# Altium PCB testPCB.PcbDoc
Units mil, origin at the board's own origin, x right, y up, seen from the top; angles counter-clockwise.
Board outline 9990 x 5285 mil, 2 copper layers (Top Layer, Bottom Layer); 128 components, 70 nets, 541 pads, 0 vias.
Unrouted connection lines stored in the file: 277.
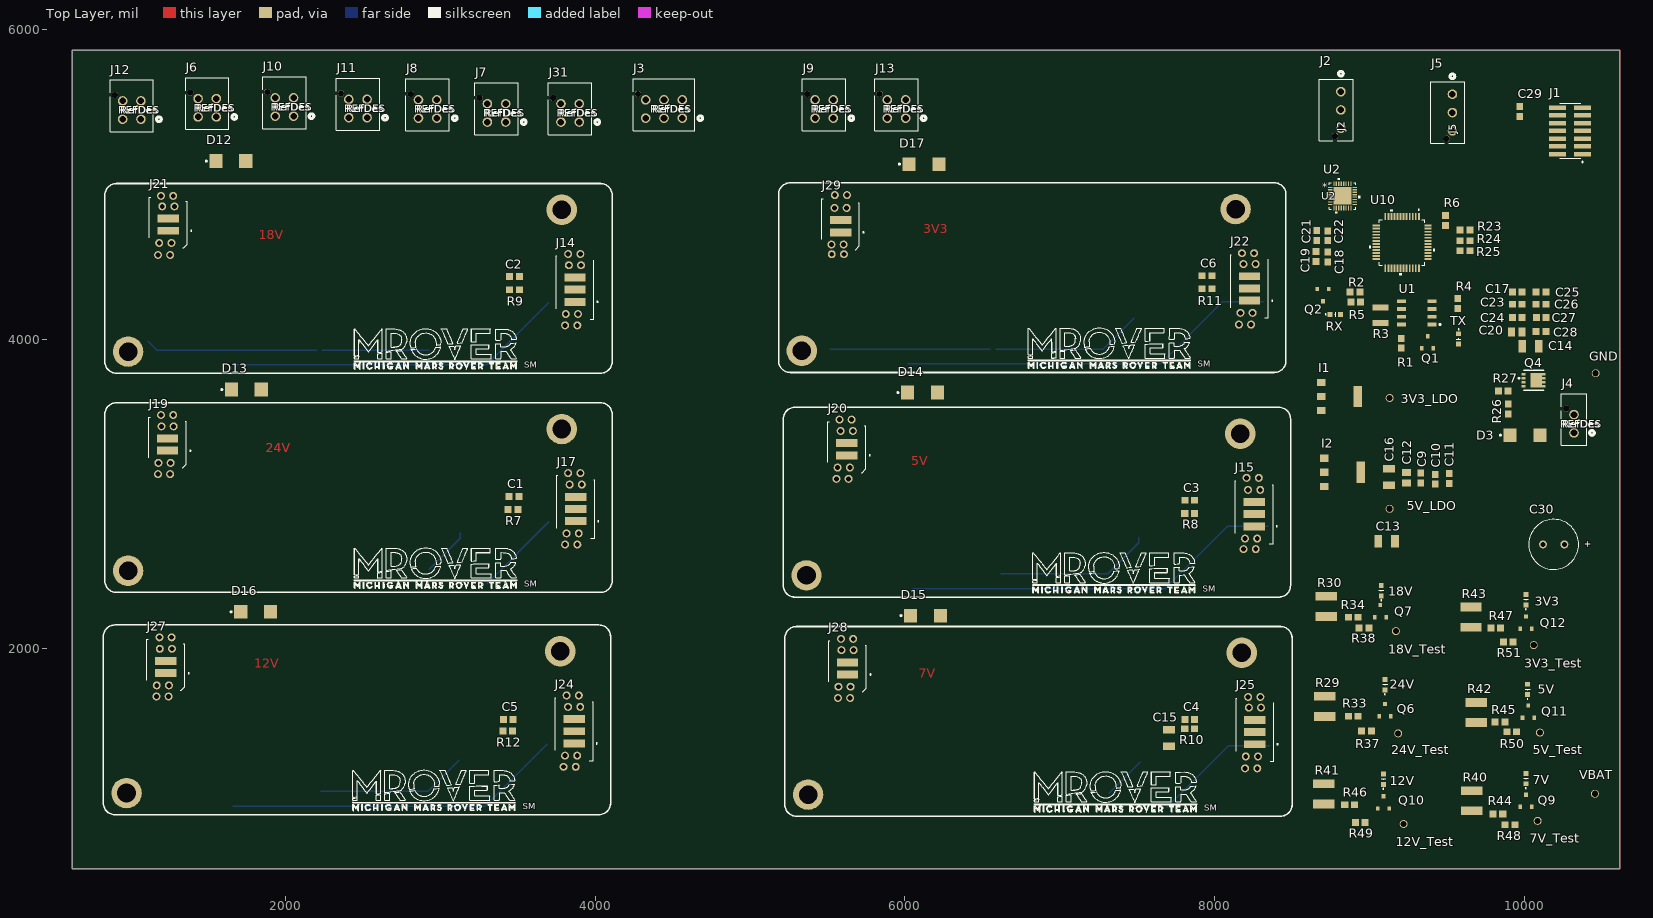
[diagram p0: Top Layer view]
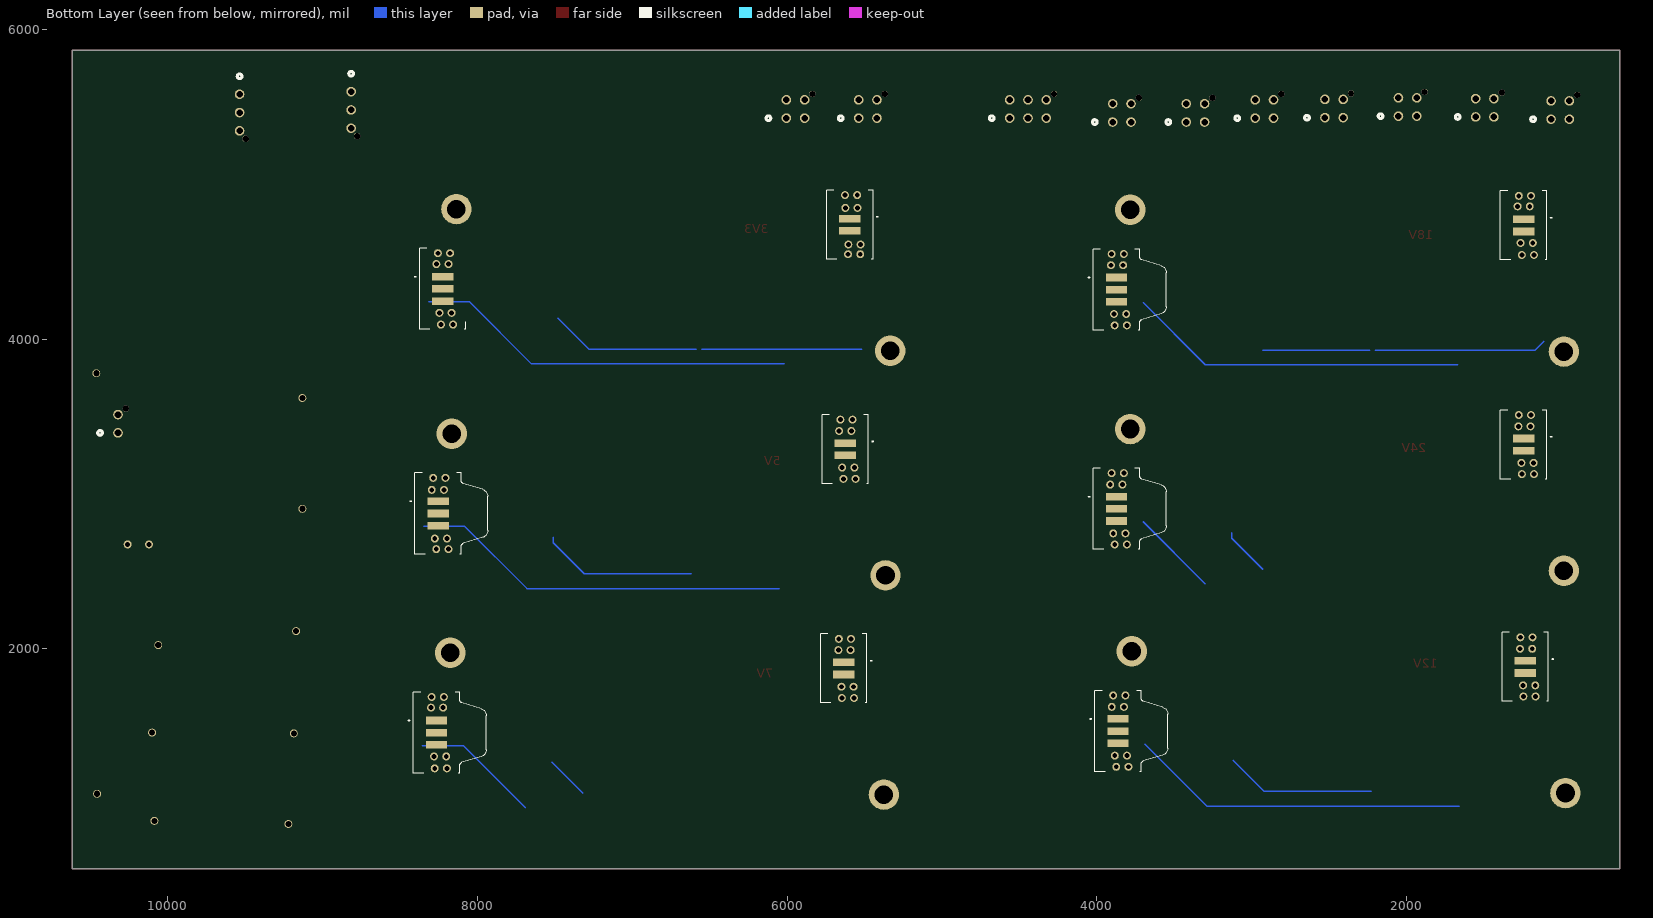
[diagram p1: Bottom Layer view, seen from below]

## Layer stack, top to bottom
Top Solder: solder mask 0.4, Solder Resist, Dk 3.5
Top Layer: signal copper 1.4
Dielectric 1: dielectric 12.6, FR-4, Dk 4.8
Bottom Layer: signal copper 1.4
Bottom Solder: solder mask 0.4, Solder Resist, Dk 3.5

## Board outline
625,580 625,5865 10615,5865 10615,580

## Design rules (kind name [scope] priority, off if disabled: settings)
Clearance [All] p1: gap=10 ignorepadtopadclearanceinfootprint=FALSE
DiffPairsRouting [All] p1: maxlimit=10 minlimit=10 mostfreqgap=10 toplayer_minwidth=15 toplayer_maxwidth=15 toplayer_prefwidth=15 bottomlayer_minwidth=15 bottomlayer_maxwidth=15 bottomlayer_prefwidth=15 maxuncoupledlength=500
PolygonConnect [All] p1: connectstyle=Relief reliefconductorwidth=10 reliefentries=4 polygonreliefangle="90 Angle" airgapwidth=10
RoutingVias [All] p1: holewidth=28 width=50 viastyle="Through Hole" minholewidth=28 minwidth=50 maxholewidth=28 maxwidth=50
SolderMaskExpansion [All] p1: expansion=0 istentingtop=FALSE
SupplyNets "Schematic Supply Nets_10" [InNet('18V_IN')] p1: voltage=0.000
SupplyNets "Schematic Supply Nets_9" [InNet('VBAT_MCU')] p2: voltage=0.000
SupplyNets "Schematic Supply Nets_8" [InNet('AGND')] p3: voltage=0.000
SupplyNets "Schematic Supply Nets_7" [InNet('12V_BUCK_C')] p4: voltage=0.000
SupplyNets "Schematic Supply Nets_6" [InNet('7V_IN')] p5: voltage=0.000
SupplyNets "Schematic Supply Nets_5" [InNet('5V_LDO')] p6: voltage=0.000
SupplyNets "Schematic Supply Nets_4" [InNet('24V_IN')] p7: voltage=0.000
SupplyNets "Schematic Supply Nets_3" [InNet('12V_IN')] p8: voltage=0.000
SupplyNets "Schematic Supply Nets_2" [InNet('VBAT')] p9: voltage=0.000
SupplyNets "Schematic Supply Nets_1" [InNet('5V_IN')] p10: voltage=0.000
SupplyNets "Schematic Supply Nets" [InNet('3V3_IN')] p11: voltage=0.000
Width [All] p1: maxlimit=10 minlimit=10 preferedwidth=10
29 further rules are at their usual default settings.

## Classes and differential pairs
component class PGOODs: 3V3 3V3_Test 5V 5V_Test 7V 7V_Test 12V 12V_Test 18V 18V_Test 24V 24V_Test Q6 Q7 Q9 Q10 Q11 Q12 R29 R30 R33 R34 R37 R38 R40 R41 R42 R43 R44 R45 R46 R47 R48 R49 R50 R51
component class Other_Connectors: C30 D3 D12 D13 D14 D15 D16 D17 GND J2 J3 J4 J5 J6 J7 J8 J9 J10 J11 J12 J13 J31 Q4 R26 R27 VBAT
component class MCU: C21 C22 C23 C24 C25 C26 C27 C28 C29 J1 R6 R23 R24 R25 U2 U10
component class LDOs: 3V3_LDO 5V_LDO C9 C10 C11 C12 C13 C14 C15 C16 C17 C18 C19 C20 I1 I2
component class Daughter_Card_Connectors: C1 C2 C3 C4 C5 C6 J14 J15 J17 J19 J20 J21 J22 J24 J25 J27 J28 J29 R7 R8 R9 R10 R11 R12
component class CAN_Transciever: Q1 Q2 R1 R2 R3 R4 R5 RX TX U1
differential pair CAN: +CAN_P -CAN_N

## Components (designator, comment, footprint, x,y, rotation, side; value= is the part's Value field where it differs from the comment)
3V3 "BL-HKC36G-AV-TRB" LED-0603 10039.58,2261.8 r90 top
3V3_LDO "5003" TEST-POINT-0001 9130,3620 r90 top
3V3_Test "5003" TEST-POINT-0001 10060,2025 r0 top
5V "BL-HKC36G-AV-TRB" LED-0603 10049.58,1681.81 r90 top
5V_LDO "5003" TEST-POINT-0001 9130,2905 r90 top
5V_Test "5003" TEST-POINT-0001 10100,1460 r0 top
7V "BL-HKC36G-AV-TRB" LED-0603 10039.58,1106.81 r90 top
7V_Test "5003" TEST-POINT-0001 10085,890 r0 top
12V "BL-HKC36G-AV-TRB" LED-0603 9119.58,1101.81 r90 top
12V_Test "5003" TEST-POINT-0001 9220,870 r0 top
18V "BL-HKC36G-AV-TRB" LED-0603 9105.31,2319.15 r90 top
18V_Test "5003" TEST-POINT-0001 9170,2115 r0 top
24V "BL-HKC36G-AV-TRB" LED-0603 9129.58,1711.81 r90 top
24V_Test "5003" TEST-POINT-0001 9185,1455 r0 top
C1 "GRM1885C1H302JA01D" CAP-0603 3476.5,2985 r180 top
C2 "GRM1885C1H302JA01D" CAP-0603 3480,4405 r180 top
C3 "GRM1885C1H302JA01D" CAP-0603 7840,2960 r180 top
C4 "GRM1885C1H302JA01D" CAP-0603 7840,1545 r180 top
C5 "GRM1885C1H302JA01D" CAP-0603 3440,1545 r180 top
C6 "GRM1885C1H302JA01D" CAP-0603 7950,4410 r180 top
C9 "CC0603KRX5R6BB106" CAP-0603 9330,3103.5 r270 top
C10 "CC0402KRX7R7BB104" CAP-0603 9425,3095 r270 top
C11 "CC0402KRX7R7BB104" CAP-0603 9515,3100 r270 top
C12 "CC0805JRNPO9BN471" CAP-0805 9240,3105.35 r270 top
C13 "293D106X9016A2TE3" CAP-1206 9110,2695 r0 top
C14 "293D106X9016A2TE3" CAP-1206 10039.13,3955 r180 top
C15 "293D106X9016A2TE3" CAP-1206 7705,1425 r270 top
C16 "293D106X9016A2TE3" CAP-1206 9125,3110 r270 top
C17 "CC0603KRX5R6BB106" CAP-0603 9953.5,4305 r180 top
C18 "CC0402KRX7R7BB104" CAP-0603 8730,4530 r90 top
C19 "CC0402KRX7R7BB104" CAP-0603 8655,4533.5 r90 top
C20 "CC0805JRNPO9BN471" CAP-0805 9950.35,4045 r180 top
C21 "CC0603KRX7R7BB104" CAP-0603 8660,4670 r270 top
C22 "CC0603KRX7R7BB104" CAP-0603 8730,4668.5 r270 top
C23 "CC0603KRX7R7BB104" CAP-0603 9953.5,4225 r180 top
C24 "CC0603KRX5R8BB475" CAP-0603 9953.5,4140 r180 top
C25 "CC0603KPX7R9BB103" CAP-0603 10106.5,4305 r180 top
C26 "CC0603KRX7R7BB105" CAP-0603 10106.5,4225 r180 top
C27 "CC0603KPX7R9BB103" CAP-0603 10108.5,4140 r180 top
C28 "CC0603KRX7R7BB105" CAP-0603 10106.5,4050 r180 top
C29 "CC0603KRX7R0BB104" CAP-0603 9970,5470 r270 top
C30 "860040674004" WCAP-ATUL_8X11.5(DXL) 10188.9,2675 r0 top
D3 "SMBJ40CA" "DO-214AA (SMBJ)" 10005,3380 r180 top
D12 "SMBJ18" "DO-214AA (SMBJ)" 1650,5150 r180 top
D13 "SMBJ5.0" "DO-214AA (SMBJ)" 1750,3675 r180 top
D14 "SMBJ5.0" "DO-214AA (SMBJ)" 6115,3655 r180 top
D15 "SMBJ12" "DO-214AA (SMBJ)" 6135,2215 r180 top
D16 "SMBJ12" "DO-214AA (SMBJ)" 1810,2240 r180 top
D17 "SMBJ12" "DO-214AA (SMBJ)" 6125,5130 r180 top
GND "5003" TEST-POINT-0001 10460,3780 r0 top
I1 "LM1117IMPX-3.3/NOPB" IC-SOT-223-4 8806.89,3630 r0 top
I2 "LM1117MPX-5.0/NOPB" IC-SOT-223-4 8825,3140 r0 top
J1 "FTSH-107-01-L-DV-K" SAMTEC_FTSH-107-01-L-DV-K 10294.88,5345 r90 top
J2 "2165712003" CONN_2165710003-SD_03_MOL 8815,5598.11 r90 top
J3 "Molex 43045-0612" CONN_2068320000-SD_06_MOL 4563.11,5426.89 r0 top
J4 "2068320201" CONN_2068320000-SD_02_MOL 10320,3395 r0 top
J5 "2165712003" CONN_2165710003-SD_03_MOL 9535,5581.22 r90 top
J6 "2068320401" CONN_2068320000-SD_04_MOL 1555,5435 r0 top
J7 "2068320401" CONN_2068320000-SD_04_MOL 3423.11,5401.89 r0 top
J8 "2068320401" CONN_2068320000-SD_04_MOL 2978.11,5426.89 r0 top
J9 "2068320401" CONN_2068320000-SD_04_MOL 5538.11,5426.89 r0 top
J10 "2068320401" CONN_2068320000-SD_04_MOL 2053.11,5440 r0 top
J11 "2068320401" CONN_2068320000-SD_04_MOL 2528.11,5430 r0 top
J12 "2068320401" CONN_2068320000-SD_04_MOL 1068.11,5420 r0 top
J13 "2068320401" CONN_2068320000-SD_04_MOL 6005,5426.89 r0 top
J14 "CONN-3-POS-1" SAMTEC_UMPS-03-03.5-L-V-S-W-TR 3870,4320 r90 top
J15 "CONN-3-POS-1" SAMTEC_UMPS-03-03.5-L-V-S-W-TR 8255,2870 r90 top
J17 "CONN-3-POS-1" SAMTEC_UMPS-03-03.5-L-V-S-W-TR 3875,2903.74 r90 top
J19 "CONN-2-POS-1" SAMTEC_UMPS-02-X-X-V-S-W-X 1240,3319.37 r90 top
J20 "CONN-2-POS-1" SAMTEC_UMPS-02-X-X-V-S-W-X 5625,3289.37 r90 top
J21 "CONN-2-POS-1" SAMTEC_UMPS-02-X-X-V-S-W-X 1245,4739.37 r90 top
J22 "CONN-3-POS-1" SAMTEC_UMPS-03-03.5-L-V-S-W-TR 8225.32,4327.48 r90 top
J24 "CONN-3-POS-1" SAMTEC_UMPS-03-03.5-L-V-S-W-TR 3865,1468.74 r90 top
J25 "CONN-3-POS-1" SAMTEC_UMPS-03-03.5-L-V-S-W-TR 8260,1463.74 r90 top
J27 "CONN-2-POS-1" SAMTEC_UMPS-02-X-X-V-S-W-X 1229.06,1883.11 r90 top
J28 "CONN-2-POS-1" SAMTEC_UMPS-02-X-X-V-S-W-X 5630,1874.37 r90 top
J29 "CONN-2-POS-1" SAMTEC_UMPS-02-X-X-V-S-W-X 5585,4729.37 r90 top
J31 "2068320401" CONN_2068320000-SD_04_MOL 3898.11,5401.89 r0 top
Q1 "T2N7002AK,LM" IC-SOT23-3 9375,3980 r0 top
Q2 "T2N7002AK,LM" IC-SOT23-3 8700,4284.37 r180 top
Q4 "CSD18543Q3AT" IC-8VSONCLIP 9960.16,3807.32 r270 top
Q6 "T2N7002AK,LM" IC-SOT23-3 9100,1605.63 r0 top
Q7 "T2N7002AK,LM" IC-SOT23-3 9070,2245 r0 top
Q9 "T2N7002AK,LM" IC-SOT23-3 10010,1020 r0 top
Q10 "T2N7002AK,LM" IC-SOT23-3 9090,1010 r0 top
Q11 "T2N7002AK,LM" IC-SOT23-3 10025,1595 r0 top
Q12 "T2N7002AK,LM" IC-SOT23-3 10010,2170 r0 top
R1 "RC0402FR-07470RL" RES-0603 9205,3973.5 r90 top
R2 "RC0402FR-07470RL" RES-0603 8906.5,4305 r0 top
R3 "RC1210FR-07120RL" RES-1210 9070,4154.8 r270 top
R4 "RC0603FR-07100RL" RES-0603 9570,4230 r90 top
R5 "RC0603FR-07100RL" RES-0603 8911.5,4240 r0 top
R6 "CRF2010-J/-000ELF" RES-0603 9490,4766.5 r270 top
R7 "CRF2010-J/-000ELF" RES-0603 3470,2900 r0 top
R8 "CRF2010-J/-000ELF" RES-0603 7838.5,2875 r0 top
R9 "CRF2010-J/-000ELF" RES-0603 3480,4320 r0 top
R10 "CRF2010-J/-000ELF" RES-0603 7838.5,1485 r0 top
R11 "CRF2010-J/-000ELF" RES-0603 7950,4325 r0 top
R12 "CRF2010-J/-000ELF" RES-0603 3436.5,1470 r0 top
R23 "RC0603JR-0710KL" RES-0603 9616.5,4705 r0 top
R24 "RC0603JR-0710KL" RES-0603 9616.5,4635 r0 top
R25 "RC0603JR-0710KL" RES-0603 9616.5,4570 r0 top
R26 "RC0603FR-07200KL" RES-0603 9895,3550 r90 top
R27 "RC0603FR-07100KL" RES-0603 9863.5,3665 r180 top
R29 "SR2512JK-7W100RL" RES-2512 8710,1629.96 r90 top
R30 "SR2512JK-7W100RL" RES-2512 8720,2275 r90 top
R33 "*RC0402JR-07150KL" RES-0603 8895,1565 r180 top
R34 "*RC0402JR-07150KL" RES-0603 8895,2205 r180 top
R37 "RC0603FR-0722KL" RES-0603 8980,1470 r180 top
R38 "RC0603FR-0722KL" RES-0603 8965,2135 r180 top
R40 "SR2512JK-7W100RL" RES-2512 9660,1020.04 r90 top
R41 "SR2512JK-7W100RL" RES-2512 8705,1064.96 r90 top
R42 "SR2512JK-7W100RL" RES-2512 9690,1589.96 r90 top
R43 "SR2512JK-7W100RL" RES-2512 9655,2204.96 r90 top
R44 "*RC0402JR-07150KL" RES-0603 9828.5,935 r180 top
R45 "*RC0402JR-07150KL" RES-0603 9842.02,1528.31 r180 top
R46 "*RC0402JR-07150KL" RES-0603 8871.5,995 r180 top
R47 "*RC0402JR-07150KL" RES-0603 9815,2135 r180 top
R48 "RC0402FR-0710KL" RES-0603 9906.5,865 r180 top
R49 "RC0402FR-07100KL" RES-0603 8940,880 r180 top
R50 "RC0402FR-0710KL" RES-0603 9918.5,1465 r180 top
R51 "RC0402FR-0710KL" RES-0603 9895,2045 r180 top
RX "BL-HKC36G-AV-TRB" LED-0603 8721.81,4130.43 r0 top
TX "BL-HKC36G-AV-TRB" LED-0603 9545.42,4058.2 r270 top
U1 "TCAN1044VDRQ1" IC-8SOIC 9305,4170 r90 top
U2 "ADS131M06IRSNR" QFN_M06IRSNR_TEX 8825,4925 r0 top
U10 "STM32G431CBT6" IC-LQFP48 9210,4625 r270 top
VBAT "5003" TEST-POINT-0001 10455,1065 r90 top

## Footprints (in the part's own frame and the unit in brackets; to place one, negate y for a bottom-side part, rotate by r counter-clockwise, add the part's x,y. Pads: shape width x height; smd on the part's side, far side on the other; paste and mask are expansions set on the pad)
CAP-0603 [mm]
  rect 1.15x1.1 smd: 1(-0.8,0) 2(0.8,0)
  body extent -0.8,-0.45 0.8,0.45, height 0.8
CAP-0805 [mm]
  rect 1.16x1.47 smd: 1(-0.88,0) 2(0.88,0)
  body extent -1,-0.63 1,0.63, height 0.94
CAP-1206 [mm]
  rect 1.25x2 smd: 1(-1.375,0) 2(1.375,0)
  body extent -1.6,-0.8 1.6,0.8, height 1.5
CONN_2068320000-SD_02_MOL [mil]
  round 62 / inner round 60 / far side round 62 hole 42 paste-99999 mask+0: 1(0,0) 2(0,118.11)
  round 40 / inner round 60 / far side round 40 hole 40 unplated paste-99999 mask+0: 3(-50.39,156.69)
  silkscreen extent -81,-81 131,254
CONN_2068320000-SD_04_MOL [mil]
  round 62 / inner round 60 / far side round 62 hole 42 paste-99999 mask+0: 1(0,0) 2(-118.11,0) 3(0,118.11) 4(-118.11,118.11)
  round 40 / inner round 60 / far side round 40 hole 40 unplated paste-99999 mask+0: 5(-168.5,156.69)
  silkscreen extent -199,-81 131,254
CONN_2068320000-SD_06_MOL [mil]
  round 62 / inner round 60 / far side round 62 hole 42 paste-99999 mask+0: 1(0,0) 2(-118.11,0) 3(-236.22,0) 4(0,118.11) 5(-118.11,118.11) 6(-236.22,118.11)
  round 40 / inner round 60 / far side round 40 hole 40 unplated paste-99999 mask+0: 7(-286.61,156.69)
  silkscreen extent -317,-81 131,254
CONN_2165710003-SD_03_MOL [mil]
  round 62 hole 42 paste-99999 mask+0: 1(0,0) 2(-118.11,0) 3(-236.22,0)
  round 42 hole 42 unplated paste-99999 mask+0: 4(-286.61,38.58)
  silkscreen extent -317,-81 131,139
"DO-214AA (SMBJ)" [mm]
  rect 2.16x2.26 smd: 1(-2.416,0) 2(2.484,0)
  silkscreen extent 3.94,-0.12 4.19,0.12, body extent -2.72,-1.95 2.78,1.95, height 2.45
IC-8SOIC [mm]
  rect 0.6x1.5 smd: 1(-1.905,-2.5) 2(-0.635,-2.5) 3(0.635,-2.5) 4(1.905,-2.5) 5(1.905,2.5) 6(0.635,2.5) 7(-0.635,2.5) 8(-1.905,2.5)
  silkscreen extent -2.03,-3.94 -1.78,-3.69, body extent -2.45,-3 2.45,3, height 1.75
IC-8VSONCLIP [mm]
  rect 0.4x0.7 smd paste-100 mask+0.05: 1(2.812,0.877) 2(0.862,0.877) 2(1.512,0.877) 2(2.162,0.877) 3(0.862,4.077) 3(1.512,4.077) 3(2.162,4.077) 3(2.812,4.077)
  rect 2.45x1.9 smd paste-100 mask+0.05: 3(1.837,2.917)
  silkscreen extent 0.19,0.03 3.49,4.18, body extent 0.18,0.89 3.48,4.19, height 1.1
IC-LQFP48 [mil]
  rect 47x12 smd paste+0 mask+0: 1(-167.32,108.27) 2(-167.32,88.58) 3(-167.32,68.9) 4(-167.32,49.21) 5(-167.32,29.53) 6(-167.32,9.84) 7(-167.32,-9.84) 8(-167.32,-29.53) 9(-167.32,-49.21) 10(-167.32,-68.9) 11(-167.32,-88.58) 12(-167.32,-108.27) 25(167.32,-108.27) 26(167.32,-88.58) 27(167.32,-68.9) 28(167.32,-49.21) 29(167.32,-29.53) 30(167.32,-9.84) 31(167.32,9.84) 32(167.32,29.53) 33(167.32,49.21) 34(167.32,68.9) 35(167.32,88.58) 36(167.32,108.27)
  rect 12x47 smd paste+0 mask+0: 13(-108.27,-167.32) 14(-88.58,-167.32) 15(-68.9,-167.32) 16(-49.21,-167.32) 17(-29.53,-167.32) 18(-9.84,-167.32) 19(9.84,-167.32) 20(29.53,-167.32) 21(49.21,-167.32) 22(68.9,-167.32) 23(88.58,-167.32) 24(108.27,-167.32) 37(108.27,167.32) 38(88.58,167.32) 39(68.9,167.32) 40(49.21,167.32) 41(29.53,167.32) 42(9.84,167.32) 43(-9.84,167.32) 44(-29.53,167.32) 45(-49.21,167.32) 46(-68.9,167.32) 47(-88.58,167.32) 48(-108.27,167.32)
  silkscreen extent -214,-211 211,211, body extent -177,-177 177,177, height 63
IC-SOT23-3 [mm]
  rect 0.6x0.7 smd: 1(-0.95,-1) 2(0.95,-1) 3(0,1)
  body extent -1.46,-1.18 1.46,1.19, height 1.12
IC-SOT-223-4 [mm]
  rect 1.4x1.2 smd mask+0.07: 1(-3,2.3) 3(-3,-2.3) 4(-3,0)
  rect 1.4x3.5 smd: 2(3,0)
  body extent -3.5,-3.25 3.5,3.25, height 1.68
LED-0603 [mm]
  rect 0.8x0.8 smd: 1(2.291,0.751) 2(0.589,0.751)
  silkscreen extent -0.2,0.34 1.52,1.13, body extent 0.65,0.36 2.25,1.16, height 0.39
QFN_M06IRSNR_TEX [mil]
  rect 30x8 smd paste+0 mask+0: 1(-78.5,55.12) 2(-78.5,39.38) 3(-78.5,23.62) 4(-78.5,7.88) 5(-78.5,-7.88) 6(-78.5,-23.62) 7(-78.5,-39.38) 8(-78.5,-55.12) 17(78.5,-55.12) 18(78.5,-39.38) 19(78.5,-23.62) 20(78.5,-7.88) 21(78.5,7.88) 22(78.5,23.62) 23(78.5,39.38) 24(78.5,55.12)
  rect 8x30 smd paste+0 mask+0: 9(-55.12,-78.5) 10(-39.38,-78.5) 11(-23.62,-78.5) 12(-7.88,-78.5) 13(7.88,-78.5) 14(23.62,-78.5) 15(39.38,-78.5) 16(55.12,-78.5) 25(55.12,78.5) 26(39.38,78.5) 27(23.62,78.5) 28(7.88,78.5) 29(-7.88,78.5) 30(-23.62,78.5) 31(-39.38,78.5) 32(-55.12,78.5)
  rect 114x114 smd paste-57 mask+0: 33(0,0)
  silkscreen extent -86,-114 114,114, body extent -81,-81 81,81, height 32
RES-0603 [mm]
  rect 1.15x1.1 smd: 1(-0.8,0) 2(0.8,0)
  body extent -0.8,-0.4 0.8,0.4, height 0.43
RES-1210 [mm] "Chip Resistor, 2-Leads, Body 3.10x2.60mm, IPC High Density"
  rect 0.95x2.6 smd: 1(-1.275,0) 2(1.275,0)
  body extent -1.6,-1.35 1.6,1.35, height 0.6
RES-2512 [mm]
  rect 1.45x3.5 smd: 1(-1.65,0) 2(1.65,0)
SAMTEC_FTSH-107-01-L-DV-K [mm]
  rect 0.74x2.79 smd: 01(-3.81,-2.035) 02(-3.81,2.035) 03(-2.54,-2.035) 04(-2.54,2.035) 05(-1.27,-2.035) 06(-1.27,2.035) 07(0,-2.035) 08(0,2.035) 09(1.27,-2.035) 10(1.27,2.035) 11(2.54,-2.035) 12(2.54,2.035) 13(3.81,-2.035) 14(3.81,2.035)
  silkscreen extent -5.19,-2.13 4.53,1.72, body extent -4.44,-2.82 4.44,3.02, height 5.96
SAMTEC_UMPS-02-X-X-V-S-W-X [mm]
  rect 1.3x3.5 smd: 01(-1,0) 02(1,0)
  round 1.308 hole 0.8: SH1(-3,1.5) SH2(3,1) SH3(-3,-0.5) SH4(3,-1)
  silkscreen extent -3.83,-3.85 4.52,3.1
SAMTEC_UMPS-03-03.5-L-V-S-W-TR [mm]
  rect 1.3x3.5 smd: 01(-2,0) 02(0,0) 03(2,0)
  round 1.308 hole 0.8: S1(-4,1.5) S2(4,1) S3(-4,-0.5) S4(4,-1)
  silkscreen extent -4.82,-3.8 5.53,3.1
TEST-POINT-0001 [mm] "2024 miniature test point"
  round 1.3 hole 1: 1(0,0)
  body extent -1.27,-1.27 1.27,1.27, height 4.57
WCAP-ATUL_8X11.5(DXL) [mm]
  round 1.308 hole 0.8: 1(1.75,0) 2(-1.75,0)
  silkscreen extent -4.1,-4.1 4.1,4.1

## Part data
3V3 5V 7V 12V 18V 24V RX TX: library part LED-0001, "LED YELLOW CLEAR 0603 SMD", Forward Current=30mA, Forward Voltage=2V, ComponentLink1Description=Datasheet, ComponentLink1URL=https://www.americanbrightled.com/pdffiles/led-components/smt/BL-HKC36G-AV-TRB.pdf
3V3_LDO 3V3_Test 5V_LDO 5V_Test 7V_Test 12V_Test 18V_Test 24V_Test GND VBAT: library part TEST-POINT-0001, "Oranange PC Test Point, Miniature Phoisphor Bronze Silver Plating Through Hole Mounting Type"
C1 C2 C3 C4 C5 C6: library part CAP-3N-0001, "3000 pF ±5% 50V Ceramic Capacitor C0G, NP0 0603 (1608 Metric)", Capacitance="47 nF", Voltage=50V, ComponentLink1Description=Datasheet, ComponentLink1URL=https://mm.digikey.com/Volume0/opasdata/d220001/medias/docus/41/CL32B106KBJNNNE_Spec.pdf, Device Class=Ceramic, Size=1210
C9 C17: library part CAP-10U-0001, "CAP CER 10UF 10V X5R 0603", Capacitance="10 uF", Voltage=10V, ComponentLink1Description=Datasheet, ComponentLink1URL=https://www.yageo.com/upload/media/product/app/datasheet/mlcc/upy-gphc_x5r_4v-to-50v.pdf, Device Class=Ceramic, Size=0603
C10 C11 C18 C19: library part CAP-0.1U-0001, "CAP CER 0.1UF 16V X7R 0402", Capacitance="100 nF", Voltage Rating="16 V", ComponentLink2Description=Datasheet, ComponentLink2URL=https://www.yageo.com/upload/media/product/productsearch/datasheet/mlcc/UPY-GPHC_X7R_6.3V-to-250V_24.pdf, Device Class=Ceramic, Size=0402
C12 C20: library part CAP-470P-0001, "CAP CER 470PF 50V C0G/NPO 0805", Capacitance="470 pF", Voltage=50V, ComponentLink1Description=Datasheet, ComponentLink1URL=https://www.yageo.com/upload/media/product/productsearch/datasheet/mlcc/UPY-GP_NP0_16V-to-50V_18.pdf, Device Class=Ceramic, Size=0805
C13 C14 C15 C16: library part CAP-10U-0004, "CAP TANT 10UF 10% 16V 1206", Capacitance="10 uF", Voltage=16V, ComponentLink1Description=Datasheet, ComponentLink1URL=https://www.lcsc.com/datasheet/lcsc_datasheet_2304140030_Vishay-Intertech-293D106X9016A2TE3_C110038.pdf, Device Class=Tantalum, Size=1206
C21 C22 C23: library part CAP-0.1U-0003, "0.1 µF ±10% 16V Ceramic Capacitor X7R 0603 (1608 Metric)", Capacitance="100 nF", Voltage Rating="16 V"
C24: library part CAP-4.7U-0001, "CAP CER 4.7UF 25V X5R 0603", Capacitance="4.7 uF", Voltage=25V, Device Class=Ceramic, Size=0603
C25 C27: library part CAP-10N-0002, "CAP CER 10000PF 50V X7R 0603", Capacitance="10 nF", Voltage="50 V", ComponentLink2Description=Datasheet, ComponentLink2URL=http://www.yageo.com/documents/recent/UPY-GPHC_X7R_6.3V-to-50V_18.pdf, Device Class=Ceramic, Size=0603
C26 C28: library part CAP-1U-0002, "CAP CER 1UF 16V X7R 0603", Capacitance="1.0 uF", Voltage=16V, Device Class=Ceramic, Size=0603
C29: library part CAP-100N-0001, "CAP CER 0.1UF 100V X7R 0603", Capacitance="100 nF", Voltage="100 V", ComponentLink1Description=Datasheet, ComponentLink1URL=https://www.yageo.com/upload/media/product/app/datasheet/mlcc/upy-np0x7r_mv_100-to-630v.pdf, Device Class=Ceramic, Size=0603
C30: library part CAP-100U-0002, "100 µF 50 V Aluminum Electrolytic Capacitors Radial, Can 7000 Hrs @ 105°C", Capacitance=100u, Voltage=50V
D3: library part DIO-TVS-0001, "TVS DIODE 40VWM 64.5VC DO214AA", Current Rating=9.3A, Voltage Rating=64.5V, ComponentLink1Description=Datasheet, ComponentLink1URL=https://www.littelfuse.com/media?resourcetype=datasheets&itemid=09a6ae9a-73cb-4ac4-acac-e6dab92ab953&filename=littelfuse_tvs_diode_smbj_datasheet.pdf
D12: library part DIODE-18V-0001, "30.66V Clamp 20.6A Ipp Tvs Diode Surface Mount DO-214AA (SMBJ)", Clamping Voltage=18V, Manufacturer_Name="Littelfuse Inc", Copyright="Copyright (C) 2025 Ultra Librarian. All rights reserved.", Manufacturer_Part_Number=SMBJ18
D13: library part DIO-TVS-5V, "9.66V Clamp 65.3A Ipp Tvs Diode Surface Mount DO-214AA (SMBJ)", Voltage=24V
D14: library part DIO-TVS-5V, "9.66V Clamp 65.3A Ipp Tvs Diode Surface Mount DO-214AA (SMBJ)", Voltage=5V
D15: library part DIO-TVS-12V, "20.9V Clamp 30.2A Ipp Tvs Diode Surface Mount DO-214AA (SMBJ)", Voltage=7V
D16: library part DIO-TVS-12V, "20.9V Clamp 30.2A Ipp Tvs Diode Surface Mount DO-214AA (SMBJ)", Voltage=12V
D17: library part DIO-TVS-12V, "20.9V Clamp 30.2A Ipp Tvs Diode Surface Mount DO-214AA (SMBJ)", Voltage=3V3
I1: library part IC_LDO_3V3_0001, "IC REG LIN 3.3V 800MA SOT223-4", ComponentLink1Description="New link", ComponentLink1URL=https://www.ti.com/lit/ds/symlink/lm1117.pdf?HQS=dis-dk-null-digikeymode-dsf-pf-null-wwe&ts=1721700739746
I2: library part IC_LDO_5V_0001, "IC REG LINEAR 5V 800MA SOT223-4", ComponentLink1Description=Datasheet, ComponentLink1URL=https://www.ti.com/lit/ds/symlink/lm1117.pdf?HQS=dis-dk-null-digikeymode-dsf-pf-null-wwe&ts=1721700739746
J1: library part CONN_Flashing-0001, "Connector Header Surface Mount 14 position 0.050\" (1.27mm)", Package=None, Availability=Unavailable, ComponentLink1Description=Datasheet, ComponentLink1URL=https://mm.digikey.com/Volume0/opasdata/d220001/medias/docus/6209/ftsh-1xx-xx-xxx-dv-xxx-xxx-x-xx-mkt.pdf, MF=Samtec, MP=FTSH-107-01-L-DV-K, Price=None
J2 J5: library part CONN-3-POS-2, "Micro-Fit+ Vertical Header, Through Hole, 3.00mm Pitch, Single Row, 3 Circuits, 0.38Âµm Gold (Au) Plating, Glow-Wire Capable, Black", Manufacturer_Name="Molex Connector Corporation", Copyright="Copyright (C) 2026 Ultra Librarian. All rights reserved.", Manufacturer_Part_Number=2165712003, RefDes=RefDes, Type=Type
J3: library part CONN-6POS-0001, "CONN HEADER VERT 6POS 3MM", ComponentLink1Description=Datasheet, ComponentLink1URL=https://tools.molex.com/pdm_docs/ps/PS-43045.pdf
J4: library part CONN-2-POS-2, "Micro-Fit+ Vertical Header, Through Hole, 3.00mm Pitch, Dual Row, 2 Circuits, Tin (Sn) Plating, Glow-Wire Capable, Black, Tray", Manufacturer_Name="Molex Connector Corporation", Copyright="Copyright (C) 2025 Ultra Librarian. All rights reserved.", Manufacturer_Part_Number=2068320201, RefDes=RefDes, Type=Type
J6 J7 J8 J9 J10 J11 J12 J13 J31: library part CONN-4-POS-1, "Micro-Fit+ Vertical Header, Through Hole, 3.00mm Pitch, Dual Row, 4 Circuits, Tin (Sn) Plating, Glow-Wire Capable, Black, Tray", Manufacturer_Name="Molex Connector Corporation", Copyright="Copyright (C) 2025 Ultra Librarian. All rights reserved.", Manufacturer_Part_Number=2068320401, RefDes=RefDes, Type=Type
J14 J15 J17 J22 J24 J25: "3 Position Receptacle, Female Blade Sockets Connector Solder 0.079 (2.00mm) Surface Mount", Package=None, Check_prices=https://www.snapeda.com/parts/UMPS-03-03.5-L-V-S-W-TR/Samtec/view-part/?ref=eda, MF="Samtec Inc.", MP=UMPS-03-03.5-L-V-S-W-TR, SnapEDA_Link=https://www.snapeda.com/parts/UMPS-03-03.5-L-V-S-W-TR/Samtec/view-part/?ref=snap
J19 J20 J21 J27 J28 J29: Package=None, Availability=Unavailable, MF=SAMTEC, MP=UMPS-02-X-X-V-S-W-X, Price=None
Q1 Q2 Q6 Q7 Q9 Q10 Q11 Q12: library part NMOS-200MA-0001, "MOSFET N-CH 60V 200MA SOT23", Continuous Current=200mA, Voltage=60V, ComponentLink1Description=Datasheet, ComponentLink1URL=https://toshiba.semicon-storage.com/info/T2N7002AK_datasheet_en_20150401.pdf?did=29712&prodName=T2N7002AK
Q4: library part NMOS-60A-0001, "MOSFET N-CH 60V 12A/60A 8VSON", Continuous Current=60A, Voltage=60V, ComponentLink2Description=Datasheet, ComponentLink2URL=http://www.ti.com/lit/ds/symlink/csd18543q3a.pdf
R1 R2: library part RES-470-0001, "RES 470 OHM 1% 1/16W 0603", Power=1/16W, Resistance=470R, Tolerance=1%, ComponentLink1Description=Datasheet, ComponentLink1URL=https://www.yageo.com/upload/media/product/products/datasheet/rchip/PYu-RC_Group_51_RoHS_L_12.pdf, Size=0603
R3: library part RES-120-0001, "RES 120 OHM 1% 1/2W 1210", Power=1/2W, Resistance=120R, Tolerance=1%, ComponentLink1Description=Datasheet, ComponentLink1URL=https://www.yageo.com/upload/media/product/products/datasheet/rchip/PYu-RC_Group_51_RoHS_L_12.pdf, Size=1210
R4 R5: library part RES-100-0001, "RES 100 OHM 1% 1/16W 0603", Power=1/16W, Resistance=100R, Tolerance=1%, ComponentLink1Description=Datasheet, ComponentLink1URL=https://www.yageo.com/upload/media/product/products/datasheet/rchip/PYu-RC_Group_51_RoHS_L_12.pdf, Size=0603
R6: library part RES-0-0001, "0 Ohms Jumper Chip Resistor 2010 (5025 Metric) Automotive AEC-Q200 Metal Element", Resistance=0Ω, Tolerance=1%, ComponentLink1Description=Datasheet, ComponentLink1URL=https://www.yageo.com/upload/media/product/products/datasheet/rchip/PYu-RC_Group_51_RoHS_L_12.pdf, Size=0603
R7 R8 R9 R10 R11 R12: library part RES-0-0001, "0 Ohms Jumper Chip Resistor 2010 (5025 Metric) Automotive AEC-Q200 Metal Element", Resistance=1kΩ, Tolerance=1%, ComponentLink1Description=Datasheet, ComponentLink1URL=https://www.yageo.com/upload/media/product/products/datasheet/rchip/PYu-RC_Group_51_RoHS_L_12.pdf, Size=0603
R23 R24 R25: library part RES-10k-0002, "RES SMD 10kO 5% 1/10W 0603", Manufacturer_Name=Yageo, Power=1/10W, Resistance=10k, Copyright="Copyright (C) 2025 Ultra Librarian. All rights reserved.", Manufacturer_Part_Number=RC0603JR-0710KL
R26: library part RES-200k-0001, "RES SMD 200K OHM 1% 1/10W 0603", Power=100mW, Resistance=200k, Tolerance=1%, ComponentLink1Description=Datasheet, ComponentLink1URL=https://www.yageo.com/upload/media/product/products/datasheet/rchip/PYu-RC_Group_51_RoHS_L_12.pdf, Size=0603
R27: library part RES-100k-0001, "RES SMD 100K OHM 1% 1/10W 0603", Power=100mW, Resistance=100k, Tolerance=1%, ComponentLink1Description=Datasheet, ComponentLink1URL=https://www.yageo.com/upload/media/product/products/datasheet/rchip/PYu-RC_Group_51_RoHS_L_12.pdf, Size=0603
R29 R30 R40 R41 R42 R43: library part RES-100-0002, "100 Ohms ±5% 2W Chip Resistor 2512 (6332 Metric) Automotive AEC-Q200, Pulse Withstanding Thick Film", Power=2W, Resistance=100
R33 R34 R44 R45 R46 R47: library part RES-150K-0001, "150 kOhms ±5% 0.063W, 1/16W Chip Resistor 0603 (1005 Metric) Moisture Resistant Thick Film", Power=1/16W, Resistance="150k +/- 5%"
R37 R38: library part RES-22k-0001, "22 kOhms ±1% 0.1W, 1/10W Chip Resistor 0603 (1608 Metric) Moisture Resistant Thick Film", Power=1/10W, Resistance=22K
R48 R50 R51: library part RES-10k-0001, "RES 10K OHM 1% 1/16W 0402", Power=1/16W, Resistance=10k, Tolerance=1%, ComponentLink1Description=Datasheet, ComponentLink1URL=https://www.yageo.com/upload/media/product/products/datasheet/rchip/PYu-RC_Group_51_RoHS_L_12.pdf, Size=0402
R49: library part RES-100k-0002, "100 kOhms ±1% 0.063W, 1/16W Chip Resistor 0402 (1005 Metric) Moisture Resistant Thick Film", Power=1/16W, Resistance=100k
U1: library part IC-CAN-0001, "IC TRANSCEIVER 1/1 8SOIC", ComponentLink1Description=Datasheet, ComponentLink1URL=https://www.ti.com/lit/ds/symlink/tcan1044-q1.pdf?HQS=dis-dk-null-digikeymode-dsf-pf-null-wwe&ts=1728758303289&ref_url=https%253A%252F%252Fwww.ti.com%252Fgeneral%252Fdocs%252Fsuppproductinfo.tsp%253FdistId%253D10%2526gotoUrl%253Dhttps%253A%252F%252Fwww.ti.com%252Flit%252Fgpn%252Ftcan1044-q1
U2: "Six-channel, 24-bit, 32-kSPS, simultaneous-sampling, delta-sigma ADC 32-QFN -40 to 125", Manufacturer_Name="Texas Instruments", Copyright="Copyright (C) 2026 Ultra Librarian. All rights reserved.", Manufacturer_Part_Number=ADS131M06IRSNR, RefDes=RefDes, Type=Type
U10: library part IC-STM32G431CBT6, "IC MCU 32BIT 128KB FLASH 48LQFP", Package=48LQFP, ComponentLink1Description=Datasheet, ComponentLink1URL=https://www.st.com/resource/en/datasheet/stm32g431cb.pdf

## Free pads (board coordinates)
  rect 137.8x49.21 smd far side: 1(1235,1923.74) 1(1245,3358.74) 1(1245,4773.74) 1(3863.5,1548.43) 1(3873.5,2983.43) 1(3873.5,4398.43) 1(5595,4778.74) 1(5625,3328.74) 1(5635,1913.74) 1(8223.5,4403.43) 1(8253.5,2953.43) 1(8263.5,1538.43) 2(1235,1845) 2(1245,3280) 2(1245,4695) 2(3863.5,1469.68) 2(3873.5,2904.68) 2(3873.5,4319.69) 2(5595,4700) 2(5625,3250) 2(5635,1835) 2(8223.5,4324.69) 2(8253.5,2874.68) 2(8263.5,1459.68) 3(3863.5,1390.94) 3(3873.5,2825.94) 3(3873.5,4240.94) 3(8223.5,4245.94) 3(8253.5,2795.94) 3(8263.5,1380.94)
  round 196.85 hole 120: 9(975,1070) 9(985,2505) 9(985,3920) 9(3775,1985) 9(3785,3420) 9(3785,4835) 9(5335,3925) 9(5365,2475) 9(5375,1060) 9(8135,4840) 9(8165,3390) 9(8175,1975)
  round 51.5 hole 31.5: S1(1246.81,1693.43) S1(1256.81,3128.43) S1(1256.81,4543.43) S1(3875.31,1239.37) S1(3885.31,2674.37) S1(3885.31,4089.37) S1(5606.81,4548.43) S1(5636.81,3098.43) S1(5646.81,1683.43) S1(8235.31,4094.37) S1(8265.31,2644.37) S1(8275.31,1229.37) S2(1266.5,2075.32) S2(1276.5,3510.32) S2(1276.5,4925.31) S2(3895,1700) S2(3905,3135) S2(3905,4550) S2(5626.5,4930.31) S2(5656.5,3480.32) S2(5666.5,2065.32) S2(8255,4555) S2(8285,3105) S2(8295,1690) S3(1168.07,1693.43) S3(1178.07,3128.43) S3(1178.07,4543.43) S3(3796.57,1239.37) S3(3806.57,2674.37) S3(3806.57,4089.37) S3(5528.07,4548.43) S3(5558.07,3098.43) S3(5568.07,1683.43) S3(8156.57,4094.37) S3(8186.57,2644.37) S3(8196.57,1229.37) S4(1187.76,2075.32) S4(1197.76,3510.32) S4(1197.76,4925.31) S4(3816.26,1700) S4(3826.26,3135) S4(3826.26,4550) S4(5547.76,4930.31) S4(5577.76,3480.32) S4(5587.76,2065.32) S4(8176.26,4555) S4(8206.26,3105) S4(8216.26,1690)

## Nets (pads, with @x,y where several pads share a name; then routed paths per layer and width w, separated by ;. In a path a pad name is that pad's centre, name@x,y a point inside that pad or via, vN(x,y) a via of type N, cw(c..) or ccw(c..) an arc to the next point about the centre after c; other vN are vias at no path point)
3V3_IN: D17.1 J7.1 J7.2 J22.01 R47.2
5V_IN: D14.1 J3.1 J11.1 J11.2 J13.1 J13.2 J15.01 J31.1 J31.2 R45.2
5V_LDO: 5V_LDO.1 C9.2 C10.2 C11.2 C12.2 C13.2 C16.2 I1.3 I2.2 I2.4 R29.2 R30.2 R40.2 R41.2 R42.2 R43.2 U1.3
7V_IN: C15.2 D15.1 I2.3 J25.01 R44.2
12V_BUCK_C: J20.01 J28.01 J29.01
12V_IN: D16.1 J6.1 J6.2 J10.1 J10.2 J12.1 J12.2 J24.01 R46.2
18V_IN: D12.1 J8.1 J8.2 J14.01 R34.2
24V_IN: D13.1 J9.1 J9.2 J17.01 R33.2
ADC_CS: U2.17 U10.16
AGND: C1.1 C2.1 C3.1 C4.1 C5.1 C6.1 C9.1 C10.1 C11.1 C12.1 C13.1 C14.1 C15.1 C16.1 C17.1 C18.1 C19.1 C20.1 C21.1 C22.1 C23.1 C24.1 C25.1 C26.1 C27.1 C28.1 C29.1 C30.2 D3.2 D12.2 D13.2 D14.2 D15.2 D16.2 D17.2 GND.1 I1.1 I2.1 J1.05 J1.07 J1.11 J2.3 J3.2 J3.3 J5.3 J6.3 J6.4 J7.3 J7.4 J8.3 J8.4 J9.3 J9.4 J10.3 J10.4 J11.3 J11.4 J12.3 J12.4 J13.3 J13.4 J14.03 J15.03 J17.03 J19.02 J20.02 J21.02 J22.03 J24.03 J25.03 J27.02 J28.02 J29.02 J31.3 J31.4 Q1.2 Q2.2 Q4.3 Q6.2 Q7.2 Q9.2 Q10.2 Q11.2 Q12.2 R6.1 R23.2 R24.2 R25.2 R27.2 R37.1 R38.1 R48.1 R49.1 R50.1 R51.1 U1.2 U2.2 U2.3 U2.6 U2.7 U2.30 U2.31 U2.33 U10.19 U10.23 U10.35 U10.47
AUTON_LED_B: J3.6 R25.1 U10.42
AUTON_LED_G: J3.5 R24.1 U10.43
AUTON_LED_R: J3.4 R23.1 U10.44
CAN_N: J2.2 J5.2 R3.1 U1.6
CAN_P: J2.1 J5.1 R3.2 U1.7
CAN_RX_LED: R2.2 U10.30
CAN_STB: U1.8 U10.32
CAN_TX_LED: R1.2 U10.31
CURR_3V3_BUCK: C6.2 R11.1 U2.8
CURR_5V_BUCK: C3.2 R8.1 U2.1
CURR_7V_BUCK: C4.2 R10.1 U2.5
CURR_12V_BUCK: C5.2 R12.1 U2.4
CURR_18V_BUCK: C2.2 R9.1 U2.32
CURR_24V_BUCK: C1.2 R7.1 U2.29
FDCAN_RX: U1.4 U10.33
FDCAN_TX: U1.1 U10.34
Net3V3_1: 3V3.1 R43.1
Net3V3_2: 3V3.2 Q12.3
Net5V_1: 5V.1 R42.1
Net5V_2: 5V.2 Q11.3
Net7V_1: 7V.1 R40.1
Net7V_2: 7V.2 Q9.3
Net12V_1: 12V.1 R41.1
Net12V_2: 12V.2 Q10.3
Net18V_1: 18V.1 R30.1
Net18V_2: 18V.2 Q7.3
Net24V_1: 24V.1 R29.1
Net24V_2: 24V.2 Q6.3
NetJ4_1: J4.1 Q4.2
NetJ14_02: J14.02 R9.2
NetJ15_02: J15.02 R8.2
NetJ17_02: J17.02 R7.2
NetJ22_02: J22.02 R11.2
NetJ24_02: J24.02 R12.2
NetJ25_02: J25.02 R10.2
NetQ1_1: Q1.1 R1.1
NetQ1_3: Q1.3 TX.2
NetQ2_1: Q2.1 R2.1
NetQ2_3: Q2.3 RX.2
NetQ4_1: Q4.1 R26.2 R27.1
NetR4_1: R4.1 TX.1
NetR5_1: R5.1 RX.1
NetR6_2: R6.2 U10.45
NRST: C29.2 J1.12 U10.7
PGOOD_1: 24V_Test.1 Q6.1 R33.1 R37.2
PGOOD_2: 18V_Test.1 Q7.1 R34.1 R38.2
PGOOD_4: 7V_Test.1 Q9.1 R44.1 R48.2
PGOOD_5: 12V_Test.1 Q10.1 R46.1 R49.2
PGOOD_6: 5V_Test.1 Q11.1 R45.1 R50.2
PGOOD_7: 3V3_Test.1 Q12.1 R47.1 R51.2
SPI_CLK: U2.19 U10.13
SPI_MISO: U2.20 U10.14
SPI_MOSI: U2.21 U10.15
STLINK_RX: J1.13 U10.22
STLINK_TX: J1.14 U10.25
SWCLK: J1.06 U10.38
SWDIO: J1.04 U10.37
SWO: J1.08 U10.40
VBAT: C30.1 D3.1 J4.2 J19.01 J21.01 J27.01 R26.1 VBAT.1
VBAT_MCU: 3V3_LDO.1 C14.2 C17.2 C18.2 C19.2 C20.2 C21.2 C22.2 C23.2 C24.2 C25.2 C26.2 C27.2 C28.2 I1.2 I1.4 J1.03 R4.2 R5.2 U1.5 U10.1 U10.20 U10.21 U10.24 U10.36 U10.48
pads on no net: J1.01 J1.02 J1.09 J1.10 J2.4 J3.7 J4.3 J5.4 J6.5 J7.5 J8.5 J9.5 J10.5 J11.5 J12.5 J13.5 J14.S1 J14.S2 J14.S3 J14.S4 J15.S1 J15.S2 J15.S3 J15.S4 J17.S1 J17.S2 J17.S3 J17.S4 J19.SH1 J19.SH2 J19.SH3 J19.SH4 J20.SH1 J20.SH2 J20.SH3 J20.SH4 J21.SH1 J21.SH2 J21.SH3 J21.SH4 J22.S1 J22.S2 J22.S3 J22.S4 J24.S1 J24.S2 J24.S3 J24.S4 J25.S1 J25.S2 J25.S3 J25.S4 J27.SH1 J27.SH2 J27.SH3 J27.SH4 J28.SH1 J28.SH2 J28.SH3 J28.SH4 J29.SH1 J29.SH2 J29.SH3 J29.SH4 J31.5 U2.9 U2.10 U2.11 U2.12 U2.13 U2.14 U2.15 U2.16 U2.18 U2.22 U2.23 U2.24 U2.25 U2.26 U2.27 U2.28 U10.2 U10.3 U10.4 U10.5 U10.6 U10.8 U10.9 U10.10 U10.11 U10.12 U10.17 U10.18 U10.26 U10.27 U10.28 U10.29 U10.39 U10.41 U10.46
copper on no net: | length 47658.3
  Top Layer w10: 625,580 10615,580 10615,5865 625,5865 625,580
  Bottom Layer w10: 1115,3985 1170,3930 2201.72,3930 ; 1660,985 3290,985 3691.26,1386.26 ; 1670,3835 3300,3835 3701.26,4236.26 ; 2228.28,1080 2920,1080 3120,1280 ; 2238.28,3930 2930,3930 ; 2930,2515 3130,2715 3130,2750 ; 3300,2420 3701.26,2821.26 ; 5520,3935 6551.72,3935 ; 6020,3840 7650,3840 8051.26,4241.26 8315,4241.26 ; 6050,2390 7680,2390 8081.26,2791.26 8345,2791.26 ; 6588.28,3935 7280,3935 7480,4135 ; 6618.28,2485 7310,2485 7510,2685 7510,2720 ; 7320,1070 7520,1270 ; 7690,975 8091.26,1376.26 8355,1376.26

## Other copper
Top Layer:
  text "3V3" at 6120,4685 h60
  text "18V" at 1830,4645 h60
  text "24V" at 1875,3270 h60
  text "24V" at 1875,3270 h60
  text "5V" at 6040,3185 h60
  text "12V" at 1800,1880 h60
  text "7V" at 6090,1815 h60

## Silkscreen, mask and mechanical layers (free items; w line width, h text height)
Top Overlay:
  drawing of 13324 lines, arcs and shapes, not listed
  text "SM" at 7892.2,3820.98 h39.37
  text "SM" at 3542.2,3815.98 h39.37
  text "SM" at 3542.2,2400.98 h39.37
  text "SM" at 7922.2,2370.98 h39.37
  text "SM" at 3532.2,965.98 h39.37
  text "SM" at 7932.2,955.98 h39.37
Bottom Overlay:
  circle w7.87: c5447.83,3339.57 r3.94
  circle w7.87: c8430.67,2953.43 r3.94
  circle w7.87: c1057.83,1934.57 r3.94
  circle w7.87: c4040.67,1548.43 r3.94
  circle w7.87: c8440.67,1538.43 r3.94
  circle w7.87: c5457.83,1924.57 r3.94
  circle w7.87: c5417.83,4789.57 r3.94
  circle w7.87: c4050.67,2983.43 r3.94
  circle w7.87: c1067.83,3369.57 r3.94
  circle w7.87: c4050.67,4398.43 r3.94
  circle w7.87: c1067.83,4784.57 r3.94
  circle w7.87: c8400.67,4403.43 r3.94
  lines w7.87: 1096.02,1661.93 1085.39,1661.93 1085.39,2106.81 1115.71,2106.81 ; 1106.02,3096.93 1095.39,3096.93 1095.39,3541.81 1125.71,3541.81 ; 1106.02,4511.93 1095.39,4511.93 1095.39,4956.81 1125.71,4956.81 ; 1318.86,1661.93 1384.61,1661.93 1384.61,2106.81 1338.54,2106.81 ; 1328.86,3096.93 1394.61,3096.93 1394.61,3541.81 1348.54,3541.81 ; 1328.86,4511.93 1394.61,4511.93 1394.61,4956.81 1348.54,4956.81 ; 3576.07,1314.82 cw(c3589.88,1360) 3542.64,1360 3542.64,1579.37 cw(c3589.88,1579.37) 3576.07,1624.55 ; 3576.12,1314.8 3699.95,1277.08 cw(c3694.21,1258.25) 3713.9,1258.25 3713.9,1207.87 3724.53,1207.87 ; 3576.12,1624.57 3699.95,1662.29 ccw(c3694.21,1681.12) 3713.9,1681.12 3713.9,1731.5 3744.21,1731.5 ; 3586.07,2749.82 cw(c3599.88,2795) 3552.64,2795 3552.64,3014.37 cw(c3599.88,3014.37) 3586.07,3059.55 ; 3586.07,4164.82 cw(c3599.88,4210) 3552.64,4210 3552.64,4429.37 cw(c3599.88,4429.37) 3586.07,4474.55 ; 3586.12,2749.8 3709.95,2712.08 cw(c3704.21,2693.25) 3723.9,2693.25 3723.9,2642.87 3734.53,2642.87 ; 3586.12,3059.57 3709.95,3097.29 ccw(c3704.21,3116.12) 3723.9,3116.12 3723.9,3166.5 3754.21,3166.5 ; 3586.12,4164.8 3709.95,4127.08 cw(c3704.21,4108.25) 3723.9,4108.25 3723.9,4057.87 3734.53,4057.87 ; 3586.12,4474.57 3709.95,4512.29 ccw(c3704.21,4531.12) 3723.9,4531.12 3723.9,4581.5 3754.21,4581.5 ; 3947.36,1207.87 4013.11,1207.87 4013.11,1731.5 3967.05,1731.5 ; 3957.36,2642.87 4023.11,2642.87 4023.11,3166.5 3977.05,3166.5 ; 3957.36,4057.87 4023.11,4057.87 4023.11,4581.5 3977.05,4581.5 ; 5456.02,4516.93 5445.39,4516.93 5445.39,4961.81 5475.71,4961.81 ; 5486.02,3066.93 5475.39,3066.93 5475.39,3511.81 5505.71,3511.81 ; 5496.02,1651.93 5485.39,1651.93 5485.39,2096.81 5515.71,2096.81 ; 5678.86,4516.93 5744.61,4516.93 5744.61,4961.81 5698.54,4961.81 ; 5708.86,3066.93 5774.61,3066.93 5774.61,3511.81 5728.54,3511.81 ; 5718.86,1651.93 5784.61,1651.93 5784.61,2096.81 5738.54,2096.81 ; 7966.07,2719.82 cw(c7979.88,2765) 7932.64,2765 7932.64,2984.37 cw(c7979.88,2984.37) 7966.07,3029.55 ; 7966.12,2719.8 8089.95,2682.08 cw(c8084.21,2663.25) 8103.9,2663.25 8103.9,2612.87 8114.53,2612.87 ; 7966.12,3029.57 8089.95,3067.29 ccw(c8084.21,3086.12) 8103.9,3086.12 8103.9,3136.5 8134.21,3136.5 ; 7976.07,1304.82 cw(c7989.88,1350) 7942.64,1350 7942.64,1569.37 cw(c7989.88,1569.37) 7976.07,1614.55 ; 7976.12,1304.8 8099.95,1267.08 cw(c8094.21,1248.25) 8113.9,1248.25 8113.9,1197.87 8124.53,1197.87 ; 7976.12,1614.57 8099.95,1652.29 ccw(c8094.21,1671.12) 8113.9,1671.12 8113.9,1721.5 8144.21,1721.5 ; 8073.9,4113.25 8073.9,4062.87 8084.53,4062.87 ; 8307.36,4062.87 8373.11,4062.87 8373.11,4586.5 8327.05,4586.5 ; 8337.36,2612.87 8403.11,2612.87 8403.11,3136.5 8357.05,3136.5 ; 8347.36,1197.87 8413.11,1197.87 8413.11,1721.5 8367.05,1721.5
Bottom Paste:
  drawing of 48 lines, arcs and shapes, not listed
Mechanical 13:
  circle w7.87: c8430.67,2953.43 r3.94
  circle w7.87: c5447.83,3339.57 r3.94
  circle w7.87: c4040.67,1548.43 r3.94
  circle w7.87: c1057.83,1934.57 r3.94
  circle w7.87: c8440.67,1538.43 r3.94
  circle w7.87: c5457.83,1924.57 r3.94
  circle w7.87: c5417.83,4789.57 r3.94
  circle w7.87: c4050.67,2983.43 r3.94
  circle w7.87: c1067.83,3369.57 r3.94
  circle w7.87: c4050.67,4398.43 r3.94
  circle w7.87: c1067.83,4784.57 r3.94
  circle w7.87: c8400.67,4403.43 r3.94
  lines w3.94: 3576.07,1314.82 cw(c3589.88,1360) 3542.64,1360 3542.64,1579.37 cw(c3589.88,1579.37) 3576.07,1624.55 ; 3576.12,1314.8 3699.95,1277.08 cw(c3694.21,1258.25) 3713.9,1258.25 ; 3576.12,1624.57 3699.95,1662.29 ccw(c3694.21,1681.12) 3713.9,1681.12 ; 3586.07,2749.82 cw(c3599.88,2795) 3552.64,2795 3552.64,3014.37 cw(c3599.88,3014.37) 3586.07,3059.55 ; 3586.07,4164.82 cw(c3599.88,4210) 3552.64,4210 3552.64,4429.37 cw(c3599.88,4429.37) 3586.07,4474.55 ; 3586.12,2749.8 3709.95,2712.08 cw(c3704.21,2693.25) 3723.9,2693.25 ; 3586.12,3059.57 3709.95,3097.29 ccw(c3704.21,3116.12) 3723.9,3116.12 ; 3586.12,4164.8 3709.95,4127.08 cw(c3704.21,4108.25) 3723.9,4108.25 ; 3586.12,4474.57 3709.95,4512.29 ccw(c3704.21,4531.12) 3723.9,4531.12 ; 7966.07,2719.82 cw(c7979.88,2765) 7932.64,2765 7932.64,2984.37 cw(c7979.88,2984.37) 7966.07,3029.55 ; 7966.12,2719.8 8089.95,2682.08 cw(c8084.21,2663.25) 8103.9,2663.25 ; 7966.12,3029.57 8089.95,3067.29 ccw(c8084.21,3086.12) 8103.9,3086.12 ; 7976.07,1304.82 cw(c7989.88,1350) 7942.64,1350 7942.64,1569.37 cw(c7989.88,1569.37) 7976.07,1614.55 ; 7976.12,1304.8 8099.95,1267.08 cw(c8094.21,1248.25) 8113.9,1248.25 ; 7976.12,1614.57 8099.95,1652.29 ccw(c8094.21,1671.12) 8113.9,1671.12 ; 8073.9,4536.12 8073.9,4113.25 8073.9,4062.87 8373.11,4062.87 8373.11,4586.5 8073.9,4586.5 ; 3713.9,1258.25 3713.9,1207.87 4013.11,1207.87 4013.11,1731.5 3713.9,1731.5 3713.9,1681.12 ; 3713.9,1258.25 3713.9,1681.12 ; 3723.9,2693.25 3723.9,3116.12 ; 3723.9,2693.25 3723.9,2642.87 4023.11,2642.87 4023.11,3166.5 3723.9,3166.5 3723.9,3116.12 ; 3723.9,4108.25 3723.9,4531.12 ; 3723.9,4108.25 3723.9,4057.87 4023.11,4057.87 4023.11,4581.5 3723.9,4581.5 3723.9,4531.12 ; 8103.9,2663.25 8103.9,2612.87 8403.11,2612.87 8403.11,3136.5 8103.9,3136.5 8103.9,3086.12 ; 8103.9,2663.25 8103.9,3086.12 ; 8113.9,1248.25 8113.9,1671.12 ; 8113.9,1248.25 8113.9,1197.87 8413.11,1197.87 8413.11,1721.5 8113.9,1721.5 8113.9,1671.12 ; 1085.39,1661.93 1085.39,2106.81 1384.61,2106.81 1384.61,1661.93 1085.39,1661.93 ; 1095.39,3096.93 1394.61,3096.93 1394.61,3541.81 1095.39,3541.81 1095.39,3096.93 ; 1095.39,4511.93 1394.61,4511.93 1394.61,4956.81 1095.39,4956.81 1095.39,4511.93 ; 5445.39,4516.93 5744.61,4516.93 5744.61,4961.81 5445.39,4961.81 5445.39,4516.93 ; 5475.39,3066.93 5475.39,3511.81 5774.61,3511.81 5774.61,3066.93 5475.39,3066.93 ; 5485.39,1651.93 5784.61,1651.93 5784.61,2096.81 5485.39,2096.81 5485.39,1651.93
Mechanical 15:
  lines w1.97: 7892.8,4053.03 8088.46,4053.03 8088.46,4036.3 8303.43,4036.3 8303.43,4053.03 8382.95,4053.03 8382.95,4596.34 8323.11,4596.34 8323.11,4613.07 8108.15,4613.07 ; 1075.55,1652.09 1099.96,1652.09 1099.96,1635.35 1314.92,1635.35 1314.92,1652.09 1394.45,1652.09 1394.45,2116.65 1334.61,2116.65 1334.61,2133.39 1119.65,2133.39 1119.65,2116.65 1075.55,2116.65 1075.55,1652.09 ; 1085.55,3087.09 1085.55,3551.65 1129.65,3551.65 1129.65,3568.39 1344.61,3568.39 1344.61,3551.65 1404.45,3551.65 1404.45,3087.09 1324.92,3087.09 1324.92,3070.35 1109.96,3070.35 1109.96,3087.09 1085.55,3087.09 ; 1085.55,4502.09 1085.55,4966.65 1129.65,4966.65 1129.65,4983.39 1344.61,4983.39 1344.61,4966.65 1404.45,4966.65 1404.45,4502.09 1324.92,4502.09 1324.92,4485.35 1109.96,4485.35 1109.96,4502.09 1085.55,4502.09 ; 3532.8,1198.03 3532.8,1741.34 3748.15,1741.34 3748.15,1758.07 3963.11,1758.07 3963.11,1741.34 4022.95,1741.34 4022.95,1198.03 3943.43,1198.03 3943.43,1181.3 3728.46,1181.3 3728.46,1198.03 3532.8,1198.03 ; 3542.8,2633.03 3542.8,3176.34 3758.15,3176.34 3758.15,3193.07 3973.11,3193.07 3973.11,3176.34 4032.95,3176.34 4032.95,2633.03 3953.43,2633.03 3953.43,2616.3 3738.46,2616.3 3738.46,2633.03 3542.8,2633.03 ; 3542.8,4048.03 3542.8,4591.34 3758.15,4591.34 3758.15,4608.07 3973.11,4608.07 3973.11,4591.34 4032.95,4591.34 4032.95,4048.03 3953.43,4048.03 3953.43,4031.3 3738.46,4031.3 3738.46,4048.03 3542.8,4048.03 ; 5435.55,4507.09 5435.55,4971.65 5479.65,4971.65 5479.65,4988.39 5694.61,4988.39 5694.61,4971.65 5754.45,4971.65 5754.45,4507.09 5674.92,4507.09 5674.92,4490.35 5459.96,4490.35 5459.96,4507.09 5435.55,4507.09 ; 5465.55,3057.09 5489.96,3057.09 5489.96,3040.35 5704.92,3040.35 5704.92,3057.09 5784.45,3057.09 5784.45,3521.65 5724.61,3521.65 5724.61,3538.39 5509.65,3538.39 5509.65,3521.65 5465.55,3521.65 5465.55,3057.09 ; 5475.55,1642.09 5475.55,2106.65 5519.65,2106.65 5519.65,2123.39 5734.61,2123.39 5734.61,2106.65 5794.45,2106.65 5794.45,1642.09 5714.92,1642.09 5714.92,1625.35 5499.96,1625.35 5499.96,1642.09 5475.55,1642.09 ; 7922.8,2603.03 7922.8,3146.34 8138.15,3146.34 8138.15,3163.07 8353.11,3163.07 8353.11,3146.34 8412.95,3146.34 8412.95,2603.03 8333.43,2603.03 8333.43,2586.3 8118.46,2586.3 8118.46,2603.03 7922.8,2603.03 ; 7932.8,1188.03 7932.8,1731.34 8148.15,1731.34 8148.15,1748.07 8363.11,1748.07 8363.11,1731.34 8422.95,1731.34 8422.95,1188.03 8343.43,1188.03 8343.43,1171.3 8128.46,1171.3 8128.46,1188.03 7932.8,1188.03

## Text inside footprints (layer, text, board x,y; h text height)
C30: Top Overlay "+" at 10385.75,2655.32 h40; Mechanical 13 "+" at 10385.75,2655.32 h40
J3: Top Overlay "RefDes" at 4370,5460.94 h50; Top Overlay "REFDES" at 4357.5,5460.94 h50; Mechanical 13 "RefDes2" at 4357.5,5460.94 h50
J4: Top Overlay "RefDes" at 10245,3429.06 h50; Top Overlay "REFDES" at 10232.5,3429.06 h50; Mechanical 13 "RefDes2" at 10232.5,3429.06 h50
J6: Top Overlay "RefDes" at 1420.94,5469.06 h50; Top Overlay "REFDES" at 1408.44,5469.06 h50; Mechanical 13 "RefDes2" at 1408.44,5469.06 h50
J7: Top Overlay "RefDes" at 3289.06,5435.94 h50; Top Overlay "REFDES" at 3276.56,5435.94 h50; Mechanical 13 "RefDes2" at 3276.56,5435.94 h50
J8: Top Overlay "RefDes" at 2844.06,5460.94 h50; Top Overlay "REFDES" at 2831.56,5460.94 h50; Mechanical 13 "RefDes2" at 2831.56,5460.94 h50
J9: Top Overlay "RefDes" at 5404.06,5460.94 h50; Top Overlay "REFDES" at 5391.56,5460.94 h50; Mechanical 13 "RefDes2" at 5391.56,5460.94 h50
J10: Top Overlay "RefDes" at 1919.06,5474.06 h50; Top Overlay "REFDES" at 1906.56,5474.06 h50; Mechanical 13 "RefDes2" at 1906.56,5474.06 h50
J11: Top Overlay "RefDes" at 2394.06,5464.06 h50; Top Overlay "REFDES" at 2381.56,5464.06 h50; Mechanical 13 "RefDes2" at 2381.56,5464.06 h50
J12: Top Overlay "RefDes" at 934.06,5454.06 h50; Top Overlay "REFDES" at 921.56,5454.06 h50; Mechanical 13 "RefDes2" at 921.56,5454.06 h50
J13: Top Overlay "RefDes" at 5870.94,5460.94 h50; Top Overlay "REFDES" at 5858.44,5460.94 h50; Mechanical 13 "RefDes2" at 5858.44,5460.94 h50
J31: Top Overlay "RefDes" at 3764.06,5435.94 h50; Top Overlay "REFDES" at 3751.56,5435.94 h50; Mechanical 13 "RefDes2" at 3751.56,5435.94 h50
U2: Top Overlay "*" at 8694,4963 h50; Mechanical 13 "*" at 8749,4963 h50